# Altium PCB CellForge_PCB.PcbDoc (part 2 of 4)
Units mm, origin at the board's own origin, x right, y up, seen from the top; angles counter-clockwise.
Board outline 170.5 x 170.5 mm, 4 copper layers (Top Layer, Solid GND Plane, Power Distribution + signals, Bottom Layer), stack 1.586 mm thick; 199 components, 117 nets, 719 pads, 464 vias.
Unrouted connection lines stored in the file: 8.
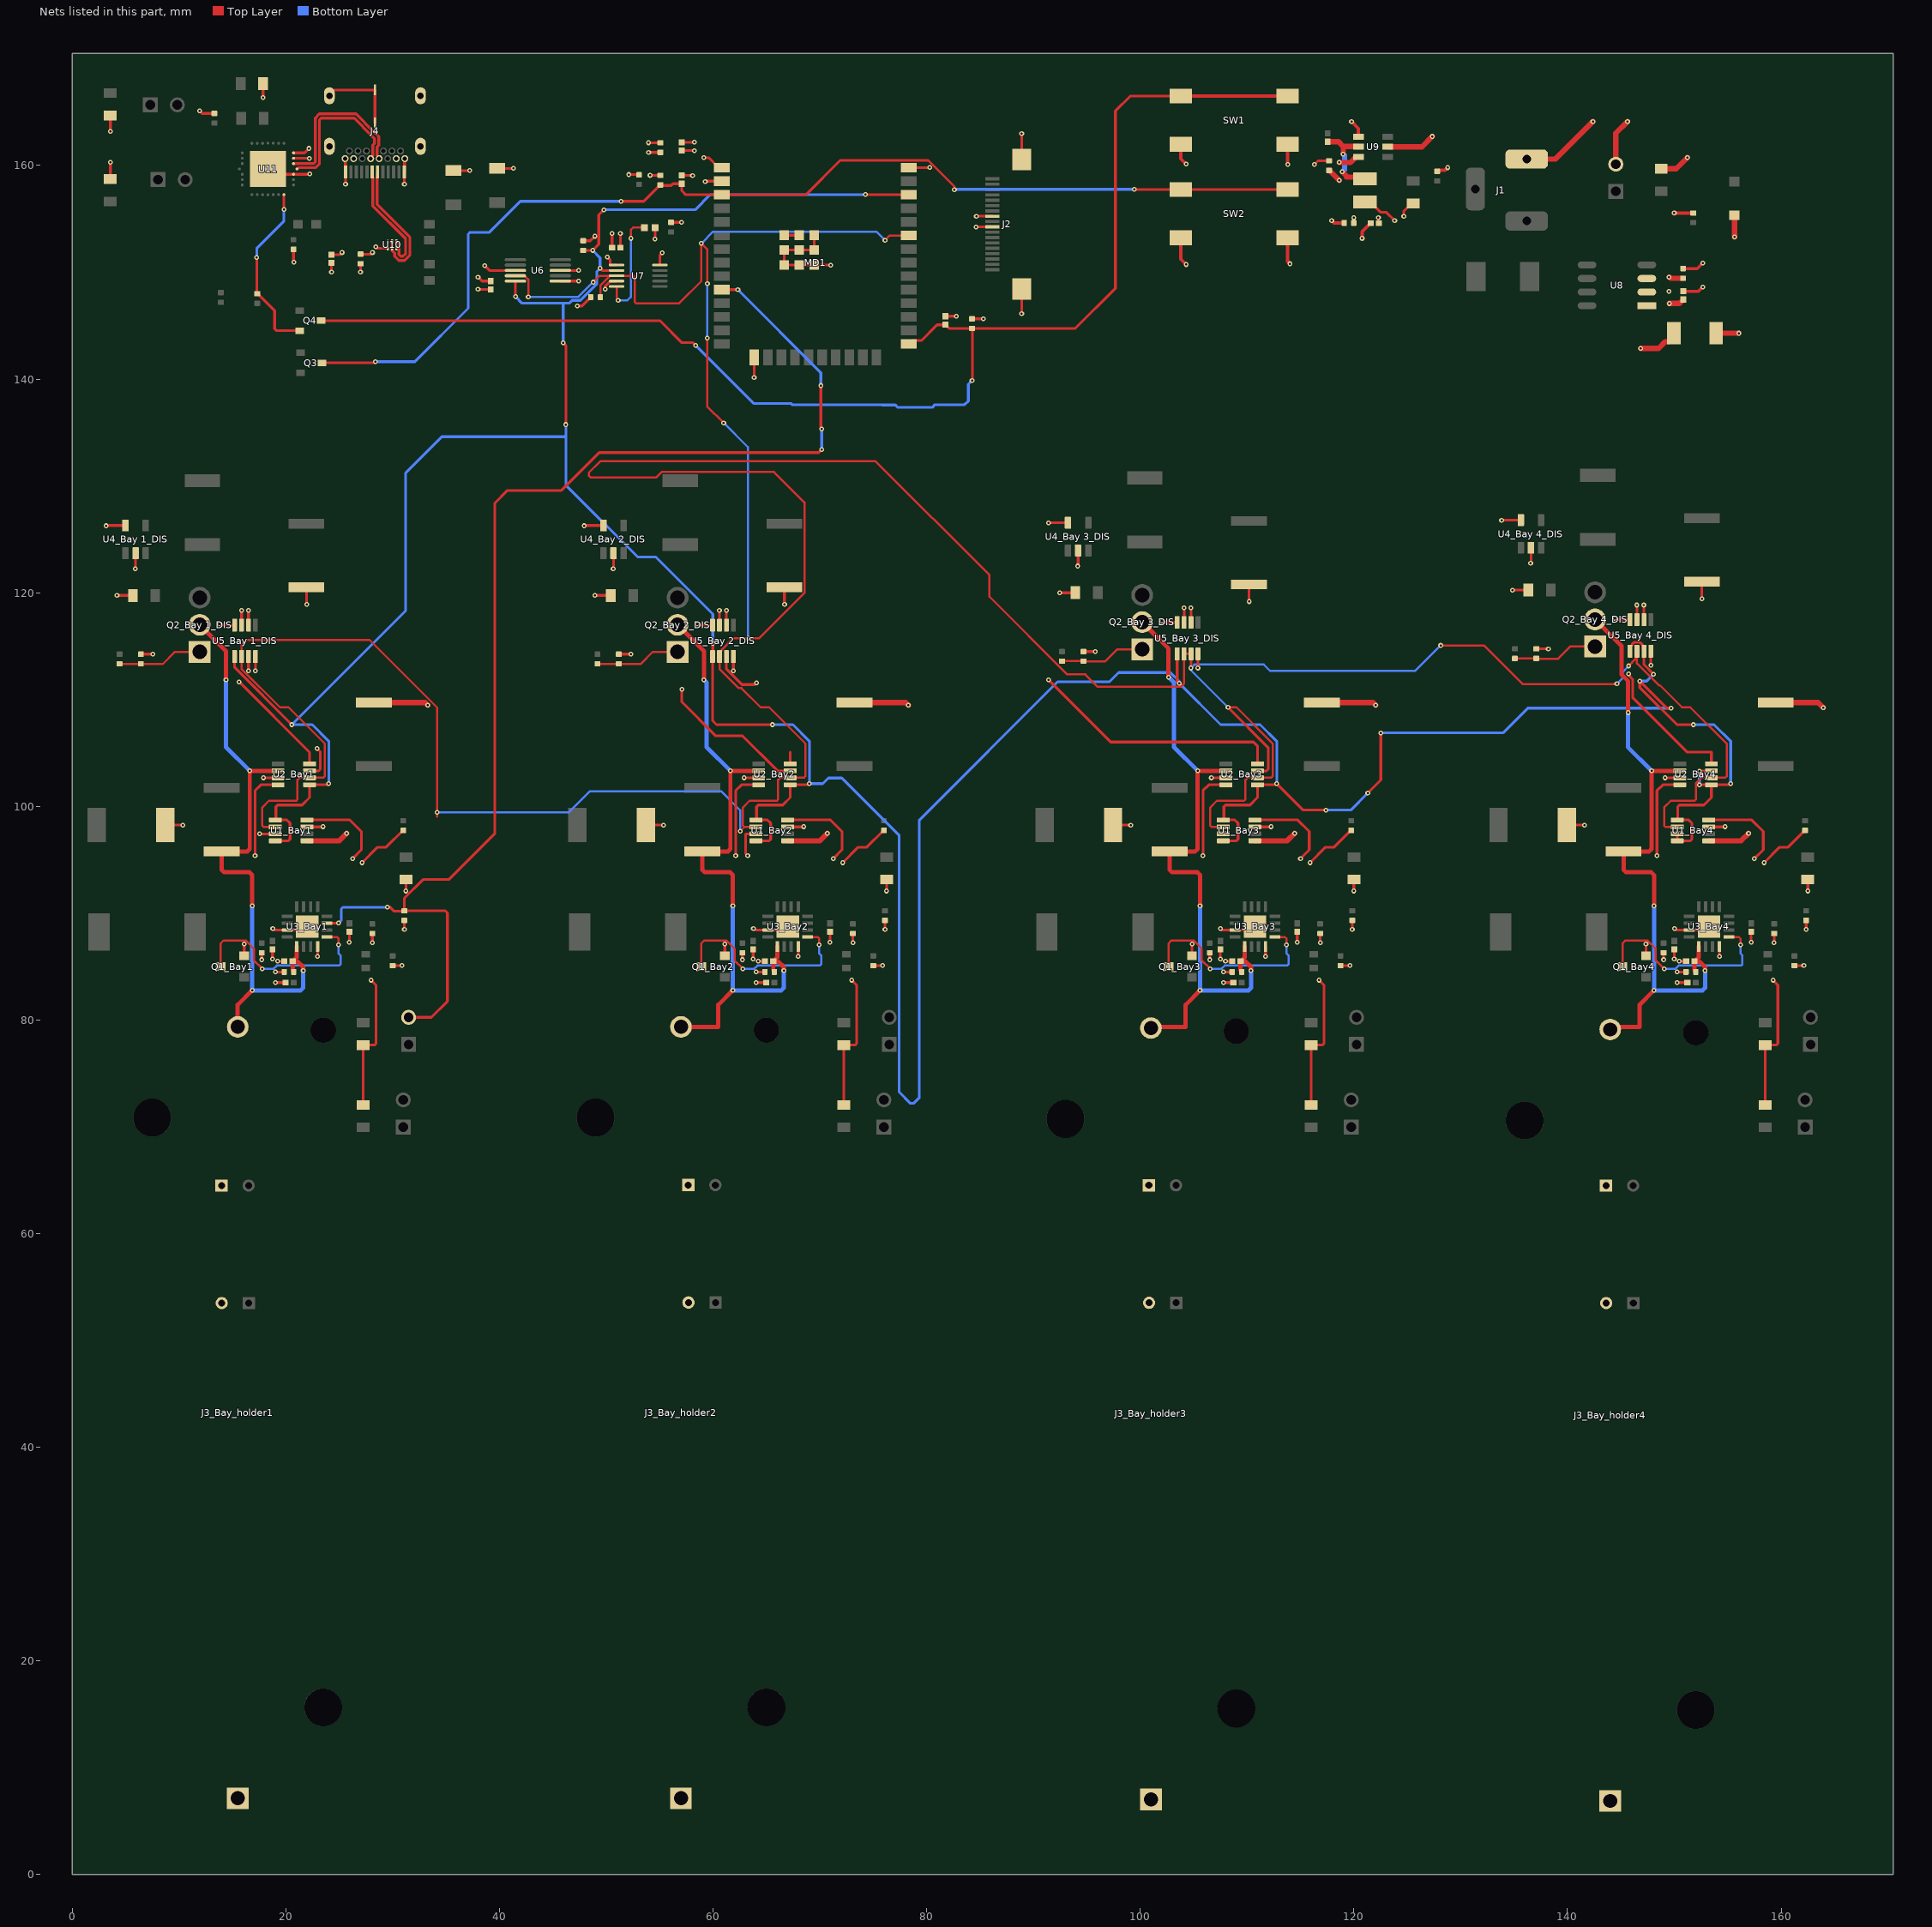
[diagram p4: the nets of this part, all layers, seen from the top]

## Part data
C1_Bay1 C1_Bay2 C1_Bay3 C1_Bay4 C4_Bay1 C4_Bay2 C4_Bay3 C4_Bay4 C5_Bay1 C5_Bay2 C5_Bay3 C5_Bay4 C9 C16 C17 C21: library part CMP-001-00074-3, "Chip Capacitor, 10µF +/-40%, 6.3V, 0402, Thickness 0.6 mm", Case/Package=0402, Max Operating Temperature=85°C, Min Operating Temperature=-55°C, Tolerance=10%, Voltage Rating=6.3V, Mounting Technology=SMT, Pins=2
C2_Bay1 C2_Bay2 C2_Bay3 C2_Bay4 C3_Bay1 C3_Bay2 C3_Bay3 C3_Bay4 C6_Bay1 C6_Bay2 C6_Bay3 C6_Bay4 C7_Bay1 C7_Bay2 C7_Bay3 C7_Bay4 C8 C10 C11 C12 C13 C14 C15 C18 C20: library part CMP-001-00001-6, "Chip Capacitor, 0.1 uF, +/- 5%, 16 V, 0402 (1005 Metric)", Capacitor Type=Ceramic, Case/Package=0402, Max Operating Temperature=125°C, Min Operating Temperature=-55°C, Tolerance=5%, Voltage Rating=16V, Mounting Technology=SM, Pins=2, RoHS Compliant=True
C19: library part CMP-001-00056-4, "Chip Capacitor, 2,2µF +/-20%, 10V, 0402, Thickness 0.6 mm", Case/Package=0402, Max Operating Temperature=85°C, Min Operating Temperature=-55°C, Tolerance=10%, Voltage Rating=10V, Mounting Technology=SMT, Pins=2
D1_Bay1 D1_Bay2 D1_Bay3 D1_Bay4: library part CMP-02539-000012-1, "DIODE SCHOTTKY 40V 3A DO214AB", Forward Current=3A, Manufacturer=Vishay, Max Junction Temp=+150°C, Max Repetitive Reverse Voltage=40V, Max Surge Forward Current=100A, Package=95402, Peak Reverse Current=0.5mA, Temperature="-55°C to +150°C", Temperature Range Low=-55°C, Automotive=No, Category=Diode, ComponentLink2Description=Datasheet, ComponentLink2URL=http://www.vishay.com/docs/88751/ss32.pdf, Device Class L1="Discrete Semiconductors", Device Class L2=Diodes, Device Class L3="Schottky Diodes", Digikey Description="DIODE SCHOTTKY 40V 3A DO214AB", Footprint Url=http://www.vishay.com/docs/95402/smc.pdf, Height=2.62mm, Lead Free=Yes, Manufacturer Part Number=SS34-E3/57T, Mouser Description="Schottky Diodes & Rectifiers 3.0 Amp 40 Volt", Octopart=https://octopart.com/ss34-e3%2F57t-vishay-39552907, RoHS=TRUE, Standoff Height=0mm, Temperature Range High=+150°C
D2: library part CMP-07401-000033-1, "TVS DIODE 15VWM 24.4VC SMB", Breakdown Voltage=19.2V, Case/Package=DO-214AA, Clamping Voltage=24.4V, Leakage Current=5uA, Max Operating Temperature=150°C, Max Power Dissipation=600W, Max Surge Current=100A, Min Breakdown Voltage=16.7V, Min Operating Temperature=-55°C, Operating Supply Voltage=3.5V, Package Quantity=1, Peak Pulse Current=24A, Power Line Protection=No, Resistor Type=Zener, Reverse Standoff Voltage=15V, Test Current=1mA, Diode Type=ZENER, Direction=Unidirectional, Element Configuration=Single, ESD Protection=Yes, Height=2.42mm, Length=4.57mm, Max Breakdown Voltage=19.2V, Max Reverse Leakage Current=5uA, Mount="Surface Mount", Number of Channels=1, Number of Elements=1, Number of Pins=2, Number of Unidirectional Channels=1, Packaging="Tape and Reel", Peak Pulse Power=600W, Polarity=Unidirectional, Radiation Hardening=No, REACH SVHC="No SVHC", Reverse Breakdown Voltage=16.7V, RoHS Compliant=Yes, Series=SMBJ, Termination=SMD/SMT, Width=3.94mm
D3: library part CMP-12792-000011-1, "DIODE ZENER 12V 500MW SOD123", Forward Current=10mA, Manufacturer="Diodes Inc", Max Junction Temp=+150°C, Max Reverse Leakage Current=0.1uA, Max Zener Voltage=12.7V, Nom Zener Voltage=12V, Package=SOD123, Power Dissipation=370mW, Reverse Voltage=8V, Temperature="-65°C to +150°C", Temperature Range Low=-65°C, Automotive=No, Automotive Grade=NA, Category=Diode, ComponentLink2Description=Datasheet, ComponentLink2URL=https://www.diodes.com/assets/Datasheets/ds18004.pdf, Device Class L1="Discrete Semiconductors", Device Class L2=Diodes, Device Class L3="Zener Diodes", Digikey Description="DIODE ZENER 12V 500MW SOD123", Footprint Url=https://www.diodes.com/assets/Package-Files/SOD123.pdf, Height=1.45mm, Lead Free=Yes, Manufacturer Part Number=BZT52C12-13-F, Mouser Description="Diode Zener Single 12V 5.39% 370mW Automotive 2-Pin SOD-123 T/R", Octopart=https://octopart.com/bzt52c12-13-f-diodes+inc.-326533, RoHS=TRUE, Standoff Height=0mm, Temperature Range High=+150°C, Zener Impedance=25Ω
DS1_Bay1 DS1_Bay2 DS1_Bay3 DS1_Bay4 DS3 DS5: library part CMP-007-00019-2, "LED Uni-Color Green, 100 mW, 30 mA, -55 to 100 degC, 2-Pin THD, RoHS, Bulk", Case/Package=Radial, Colour=Green, Forward Current=30mA, Forward Voltage=2.6V, Manufacturer=Lite-On, Max Operating Temperature=100°C, Min Operating Temperature=-55°C, Package Description="2-Pin Through Hole Device, Dia 3.8 mm", Package Quantity=1000, Power=100mW, Datasheet URL=http://datasheet.octopart.com/LTL-1CHG-Lite-On-datasheet-143841.pdf, Datasheet Version=Mar-00, Illumination Colour=Green, Lens Style=Dome, Luminous Intensity=12.6mcd, Manufacturer URL=http://www.us.liteon.com/, Mounting Technology=TH, Nominal Vf=2.1V, Package Reference=LTL-1CHG, Packaging=Bulk, Pins=2, RoHS Compliant=True, Viewing Angle=60degrees
DS2_Bay1 DS2_Bay2 DS2_Bay3 DS2_Bay4 DS6: library part CMP-007-00033-2, "The Super Bright Red Source Color Device, 1.85 V, -40 to 85 degC, 2-Pin THD, RoHS, Tape and Reel", Case/Package=Radial, Colour=Red, Forward Voltage=1.85V, Manufacturer=Kingbright, Package Description="2-Pin Through Hole Device, Dia 5.9 mm, Body Length 8.6 mm", Package Quantity=500, Package Reference=WP7113SRDD, Datasheet URL=http://www.kingbrightusa.com/images/catalog/SPEC/WP7113SRD-D.pdf, Datasheet Version="Rev. 6A, 07/2016", Illumination Colour=Red, Lens Style=Diffused, Luminous Intensity=300mcd, Mounting Technology=TH, Nominal Vf=1.85V, Packaging=Bulk, RoHS Compliant=True, Viewing Angle=30degrees
F1: library part CMP-005-00016-1, "Description", Manufacturer_Name="Littelfuse Inc", Component Type=Standard, Copyright="Copyright (C) 2025 Ultra Librarian. All rights reserved.", Design Item ID=0451004.MRL, Manufacturer_Part_Number=0451004.MRL, Pins=2, Source=0451004PMRL.SchLib
J1: library part CMP-1502-00188-3, "DC Power Jack Connector WR-DC, Male, Right Angled, THT, 5 A, 24 V", Color=Black, Current Rating=5A, Flammability Rating="UL94 V-0", Insulation Resistance=100MΩ, Max Operating Temperature=85°C, Min Operating Temperature=-40°C, Operating Supply Voltage=24V, Connector Type=Power, Contact Gender=Female, Contact Material="Gold, Tin", Contact Plating=Tin, Gender=Male, Height=11mm, Housing Material=Polyamide, Mount="Through Hole", Number of Contacts=3, Packaging=Bulk, REACH SVHC=Unknown, RoHS=Compliant, Shielding=Unshielded, Termination="Through Hole", Voltage Rating=24V
J2: library part CMP-1502-01630-3, "WR-FPC 0.50mm SMT Horiz. Bot. Contact Hinge type", Contact Resistance=50mΩ, Current Rating=500mA, Flammability Rating="UL94 V-0", Insulation Resistance=500MΩ, Max Operating Temperature=105°C, Min Operating Temperature=-40°C, Operating Supply Voltage=50V, Actuator Material="Nylon, Polyamide", Contact Material=Bronze, Contact Plating=Tin, Gender=Receptacle, Lead Pitch=500µm, Length=9.6mm, Mount="Surface Mount", Number of Contacts=18, Number of Pins=18, Number of Positions=18, Number of Rows=1, Orientation=Horizontal, Packaging="Tape and Reel", Pitch=500µm, REACH SVHC=Unknown, RoHS=Compliant, Termination=Solder, Voltage Rating=50V, Wire/Cable Type=Straight
J3_Bay_holder1 J3_Bay_holder2 J3_Bay_holder3 J3_Bay_holder4: library part CMP-19636-000034-1, "BATT HOLDER 18650 1 CELL PC PIN", Max Operating Temperature=145°C, Min Operating Temperature=-50°C, Package Quantity=50, Mount="Through Hole", Number of Cells=1, Packaging=Tray, Series=-, Termination="PC Pin"
J4: library part CMP-1502-03214-4, "Conn USB 3.1 Type C RCP 24 POS 0.5mm/0.4mm Solder RA SMD/Thru-Hole 24 Terminal 1 Port T/R", Contact Resistance=30mΩ, Current Rating=5A, Insulation Resistance=1GΩ, Max Operating Temperature=105°C, Min Operating Temperature=-40°C, Voltage Rating=20V, Connector Type=USB, Contact Material="Gold, Nickel", Gender=Receptacle, Height=3.21mm, Mount="Surface Mount, Through Hole", Number of Contacts=24, Number of Pins=24, Orientation=Horizontal, Packaging="Tape and Reel", Pin Length=1.9mm, RoHS=Compliant, Usb Standard="USB 3.1"
L1_Bay1 L1_Bay2 L1_Bay3 L1_Bay4: library part CMP-1396-00034-3, "Inductor Power Shielded Wirewound 22uH 20% 100KHz Ferrite 3A 0.05Ohm DCR Automotive T/R", Ambient Temperature Range High=110°C, Ambient Temperature Range Low=-40°C, Case/Package=Nonstandard, Current Rating=3A, DC Resistance (DCR)=42mΩ, Inductance=22µH, Inductance Tolerance=20%, Max Operating Temperature=150°C, Saturation Current=3.6A, Self Resonant Frequency=14.5MHz, Series Resistance=50mΩ, Test Frequency=100kHz, Composition=Wirewound, Core Material=Ferrite, Depth=10mm, Height=5mm, Height - Seated (Max)=5.0038mm, Length=10mm, Max DC Current=3A, Min Operating Temperature=-40°C, Mount="Surface Mount", Number of Pins=2, REACH SVHC=Unknown, RMS Current (Irms)=3A, RoHS=Compliant, Shielding=Shielded, Termination=SMD/SMT, Tolerance=20%, Width=10mm
L2: library part CMP-006-00009-6, "Chip Inductor, 2.2 uH, +/- 20%, -55 to 125 degC, 1008 (2520 Metric), RoHS, Tape and Reel", Case/Package=1008, Current Rating=1.3A, Manufacturer=Murata, Max Operating Temperature=125°C, Min Operating Temperature=-55°C, Package Description="2-Pin Surface Mounted Device, Body 2.5 x 2 mm", Package Quantity=3000, Self Resonant Frequency=40MHz, Tolerance=20%, Core Material=Ferrite, Datasheet URL=http://psearch.en.murata.com/inductor/product/LQM2HPN2R2MG0%23.pdf, Datasheet Version=Aug-16, Mounting Technology=SM, Package Reference=1008, Packaging=TapeandReel, RoHS Compliant=True, Shielding=Shielded
MD1: library part CMP-194065-000026-1, "RX TXRX MOD WIFI TRACE ANT SMD"
Q1_Bay1 Q1_Bay2 Q1_Bay3 Q1_Bay4: library part CMP-32901-000180-1, "MOSFET N-CH 60V 0.3A SOT23", Case/Package=SOT-23, Continuous Drain Current (ID)=300mA, Drain to Source Voltage (Vdss)=60V, Gate to Source Voltage (Vgs)=20V, Input Capacitance=20pF, Max Operating Temperature=150°C, Max Power Dissipation=500mW, Min Operating Temperature=-55°C, Halogen Free="Halogen Free", Lead Free="Lead Free", Max Dual Supply Voltage=60V, Mount="Surface Mount", Number of Pins=3, Packaging="Tape and Reel", Rds On Max=3R, Rise Time=3.3ns
"Q2_Bay 1_DIS" "Q2_Bay 2_DIS" "Q2_Bay 3_DIS" "Q2_Bay 4_DIS": "Disc Mosfet N-CH Linear L2 TO-220AB/FP", Manufacturer_Name=LITTELFUSE, Mouser Part Number=747-IXTP80N075L2, Datasheet Link=https://www.littelfuse.com/~/media/electronics/datasheets/discrete_mosfets/littelfuse_discrete_mosfets_n-channel_linear_ixt_80n075_datasheet.pdf.pdf, Geometry.Height=4.83mm, Manufacturer_Part_Number=IXTP80N075L2, Mouser Price/Stock=https://www.mouser.co.uk/ProductDetail/IXYS/IXTP80N075L2?qs=gQEZvVdd8Gt%252BIzAwxn7K4A%3D%3D
Q3 Q4: library part CMP-20235-000001-1, "NPN TRANSISTOR 1.5A 40V SOT-23 R", Case/Package=TO-236-3, Collector Emitter Breakdown Voltage=25V, Collector Emitter Voltage (VCEO)=400mV, Max Collector Current=1.5A, Max Power Dissipation=300mW, Transition Frequency=100MHz, Max Breakdown Voltage=25V, Mount="Surface Mount", Packaging="Tape and Reel", RoHS Compliant=Yes
R1_Bay1 R1_Bay2 R1_Bay3 R1_Bay4 R2_Bay1 R2_Bay2 R2_Bay3 R2_Bay4 R6_Bay1 R6_Bay2 R6_Bay3 R6_Bay4 R10 R11 R12 R18 R19 R20 R25 R28 R29 R34: library part CMP-009-00066-2, "10K 0.063W 1% 0402 (1005 Metric)  SMD", Case/Package=0402, Power=63mW, Tolerance=1%, Mounting Technology=SMT, Pins=2
R3_Bay1 R3_Bay2 R3_Bay3 R3_Bay4 R22: library part CMP-03412-037835-1, "RC0805JR-07100KL, RES SMD 100K OHM 5% 1/8W 0805", Case Code (Imperial)=0805, Case Code (Metric)=2012, Max Operating Temperature=155°C, Max Power Dissipation=125mW, Min Operating Temperature=-55°C, Resistance=100kR, Resistance Tolerance=5%, Resistor Type="Thick Film", Temperature Coefficient=100ppm/°C, Voltage Rating=150V, Case/Package=0805, Construction=Rectangular, Contact Plating=Tin, Depth=1.25mm, Features="Moisture Resistant", Lead Free="Lead Free", Length=2mm, Military Standard=Not, Number of Terminations=2, Packaging="Tape and Reel", Power Rating=125mW, Radiation Hardening=No, RoHS Compliant=Yes, Series=RC, Size Code=0805, Termination=SMD/SMT, Tolerance=5%
R4_Bay1 R4_Bay2 R4_Bay3 R4_Bay4 R5_Bay1 R5_Bay2 R5_Bay3 R5_Bay4 "R13_Bay 1_DIS" "R13_Bay 2_DIS" "R13_Bay 3_DIS" "R13_Bay 4_DIS" R23 R30 R31 R37 R38: library part CMP-03412-037820-1, "RC0805JR-071KL, RES SMD 1K OHM 5% 1/8W 0805", Case Code (Imperial)=0805, Case Code (Metric)=2012, Max Operating Temperature=155°C, Max Power Dissipation=125mW, Min Operating Temperature=-55°C, Resistance=1kR, Resistance Tolerance=5%, Resistor Type="Thick Film", Temperature Coefficient=100ppm/°C, Voltage Rating=150V, Case/Package=0805, Construction=Rectangular, Contact Plating=Tin, Depth=1.25mm, Features="Moisture Resistant", Lead Free="Lead Free", Length=2mm, Military Standard=Not, Number of Terminations=2, Packaging="Tape and Reel", Power Rating=125mW, Radiation Hardening=No, RoHS Compliant=Yes, Series=RC, Size Code=0805, Termination=SMD/SMT, Tolerance=5%
R7_Bay1 R7_Bay2 R7_Bay3 R7_Bay4 R9_Bay1 R9_Bay2 R9_Bay3 R9_Bay4: library part CMP-2000-05824-2, "103AT-2, Thermistor NTC 10KOhm 1% 2-Pin", Max Operating Temperature=110°C, Min Operating Temperature=-50°C, Resistance=10kR, Tolerance=1%, Height=2.4mm, Lead Pitch=2.54mm, Length=17mm, Number of Pins=2, Packaging=Bulk, RoHS Compliant=Yes, Series=AT, Termination=Radial, Width=3.7mm
R8_Bay1 R8_Bay2 R8_Bay3 R8_Bay4: library part CMP-2000-04064-1, "RC0603FR-074K53L", Manufacturer=Yageo, Part Number=RC0603FR-074K53L
"R14_Bay 1_DIS" "R14_Bay 2_DIS" "R14_Bay 3_DIS" "R14_Bay 4_DIS" R36: library part CMP-009-00137-3, "Chip Resistor, 47,5 kOhms, +/-1 %, 63 mW, -55 to 155 degC, 0402", Case/Package=0402, Max Operating Temperature=155°C, Min Operating Temperature=-55°C, Power=63mW, Tolerance=1%, Pins=2
"R15_Bay 1_DIS" "R15_Bay 2_DIS" "R15_Bay 3_DIS" "R15_Bay 4_DIS": library part CMP-009-00178-1, "Description CRM2512-FX-R200ELF", Manufacturer_Name="Bourns Electronics", Manufacturer_Part_Number=CRM2512-FX-R200ELF, Component Type=Standard, Copyright="Copyright (C) 2026 Ultra Librarian. All rights reserved.", Design Item ID=CRM2512-FX-R200ELF, Pins=2, Source=CRM2512-FX-R200ELF.SchLib
"R16_Bay 1_DIS" "R16_Bay 2_DIS" "R16_Bay 3_DIS" "R16_Bay 4_DIS": library part CMP-009-00167-3, "Chip Resistor, 100 Ohms, +/-1 %, 63 mW, -55 to 155 degC, 0402", Case/Package=0402, Max Operating Temperature=155°C, Min Operating Temperature=-55°C, Power=63mW, Tolerance=1%, Pins=2
"R17_Bay 1_DIS" "R17_Bay 2_DIS" "R17_Bay 3_DIS" "R17_Bay 4_DIS" R_SHUNT1_Bay1 R_SHUNT1_Bay2 R_SHUNT1_Bay3 R_SHUNT1_Bay4 RS1_Bay1 RS1_Bay2 RS1_Bay3 RS1_Bay4: library part CMP-009-00177-1, "RL2512FK-070R068L", Manufacturer_Name=Yageo, Component Type=Standard, Copyright="Copyright (C) 2026 Ultra Librarian. All rights reserved.", Design Item ID=RL2512FK-070R068L, Manufacturer_Part_Number=RL2512FK-070R068L, Pins=2, Source=RL2512FK-070R068L.SchLib
R21: library part CMP-009-00021-5, "Chip Resistor, 100 KOhm, +/- 1%, 0.063 W, -55 to 155 degC, 0402 (1005 Metric)", Case/Package=0402, Max Operating Temperature=155°C, Min Operating Temperature=-55°C, Power=63mW, Tolerance=1%, Voltage Rating=50V, Mounting Technology=SM, Pins=2, RoHS Compliant=True
R24: library part CMP-009-00123-3, "Chip Resistor, 22 kOhms, +/-1 %, 63 mW, -55 to 155 degC, 0402", Case/Package=0402, Max Operating Temperature=155°C, Min Operating Temperature=-55°C, Power=63mW, Tolerance=1%, Pins=2
R26 R27: library part CMP-2100-03667-1, "Chip Resistor, 0 Ohm, +/- 5%, 0.1 W, -55 to 155 degC, 0603 (1608 Metric), RoHS, Tape and Reel RC0603JR-070RL", Case Code (Imperial)=0603, Case Code (Metric)=1608, Manufacturer=Yageo, Max Operating Temperature=155degC, Min Operating Temperature=-55degC, Package Description="2-Pin Surface Mount Device, Body 1.6 x 0.8 mm", Package Quantity=5000, Power Rating=100mW, Resistance=0mOhm, Temperature Coefficient=200ppm/degreesC, Tolerance=5%, Voltage Rating=50V, Case/Package=0603, Composition=ThickFilm, Contact Plating=Tin, Datasheet URL=http://www.yageo.com/NewPortal/yageodocoutput?fileName=/pdf/R-Chip/PYu-RC_Group_51_RoHS_L_5.pdf, Datasheet Version="Rev. 5, 10/2016", Depth=0.8mm, Height=0.45mm, Lead Free=LeadFree, Length=1.6mm, Manufacturer URL=http://www.yageo.com/, Military Standard=Not, Number of Pins=2, Package Reference=0603, Packaging=TapeandReel, Radiation Hardening=No, REACH SVHC=NoSVHC, RoHSCompliant=true, Termination=SMD/SMT, Voltage Rating (DC)=50V, Width=0.8mm
R32 R33: library part CMP-03412-000130-1, "RES SMD 5.1K OHM 0.1% 1/4W 1206 RT1206BRE075K1L", Manufacturer=Yageo, Manufacturer Part Number=RT1206BRE075K1L, Package=RT1206, Power Rating=0.25W, Resistance=5.1KΩ, Temperature="-55°C to +155°C", Temperature Coefficient="50 ppm/°C", Temperature Range High=+155°C, Temperature Range Low=-55°C, Tolerance=0.005, Voltage Rating=200V, Automotive=No, Category=Res, ComponentLink2Description=Datasheet, ComponentLink2URL=http://www.yageo.com/documents/recent/PYu-RT_1-to-0.01_RoHS_L_9.pdf, Composition="Thin Film", Device Class L1="Passive Components", Device Class L2=Resistors, Device Class L3="Chip SMD Resistors", Digikey Description="RES SMD 5.1K OHM 0.1% 1/4W 1206", Footprint Url=http://www.yageo.com/exep/pages/download/literatures/PYu-R_Mount_10.pdf, Height=0.65mm, Ipc Land Pattern Name=RESC310160X55, Lead Free=Yes, Octopart=https://octopart.com/rt1206bre075k1l-yageo-1210412, RoHS=TRUE, Series=RT
R35: library part CMP-03412-003430-1, "RES SMD 22.1K OHM 1% 1/10W 0603 RT0603FRD0722K1L", Manufacturer=Yageo, Manufacturer Part Number=RT0603FRD0722K1L, Package=RT0603, Power Rating=0.1W, Resistance=22.1KΩ, Temperature="-55°C to +155°C", Temperature Coefficient="25 ppm/°C", Temperature Range High=+155°C, Temperature Range Low=-55°C, Tolerance=0.01, Voltage Rating=75V, Automotive=No, Category=Res, ComponentLink2Description=Datasheet, ComponentLink2URL=http://www.yageo.com/documents/recent/PYu-RT_1-to-0.01_RoHS_L_9.pdf, Composition="Thin Film", Device Class L1="Passive Components", Device Class L2=Resistors, Device Class L3="Chip SMD Resistors", Digikey Description="RES SMD 22.1K OHM 1% 1/10W 0603", Footprint Url=http://www.yageo.com/exep/pages/download/literatures/PYu-R_Mount_10.pdf, Height=0.55mm, Ipc Land Pattern Name=RESC16080X45, Lead Free=Yes, Octopart=https://octopart.com/rt0603frd0722k1l-yageo-71395326, RoHS=TRUE, Series=RT
SW1 SW2: library part CMP-26321-000001-1, "SWITCH TACTILE SPST-NO 0.05A 12V", Contact Current Rating=50mA, Contact Resistance=100mΩ, Manufacturer=Schurter, Operating Force=1.6N, Package=0, Temperature="-20°C to +70°C", Temperature Range High=+70°C, Temperature Range Low=-20°C, Voltage Rating Dc=12V, Automotive=No, Category=Switch, ComponentLink2Description=Datasheet, ComponentLink2URL=https://www.schurter.com/en/datasheet/typ_6x6_mm_tact_switches.pdf, Device Class L1=Electromechanical, Device Class L2=Switches, Device Class L3="Tactile Switches", Digikey Description="SWITCH TACTILE SPST-NO 0.05A 12V", Electromechanical Life=100000Cycles, Height=12.5mm, Lead Free=Yes, Manufacturer Part Number=1301.9320, Mount="Surface Mount", Octopart=https://octopart.com/1301.9320-schurter-6627962, RoHS=TRUE, Throw Configuration=SPST-NO
U1_Bay1 U1_Bay2 U1_Bay3 U1_Bay4 U2_Bay1 U2_Bay2 U2_Bay3 U2_Bay4 "U5_Bay 1_DIS" "U5_Bay 2_DIS" "U5_Bay 3_DIS" "U5_Bay 4_DIS": library part CMP-0704-00043-2, "Zero-Drift, Bi-Directional Current / Power Monitor, 3 to 5.5 V, -40 to 125 degC, 8-pin SOP (DCN8), Green (RoHS & no Sb/Br)", Manufacturer="Texas Instruments", Quiescent Current (+/-)(Typ)(mA)=0.7, Rating=Catalog, CMRR(Min)(dB)=100, Code_JEDEC=MO-178, Common Mode Range(Max)(V)=26, Common Mode Range(Min)(V)=0, ComponentLink1Description="Manufacturer URL", ComponentLink1URL=http://www.ti.com/, ComponentLink2Description=Datasheet, ComponentLink2URL=http://www.ti.com/general/docs/lit/getliterature.tsp?genericPartNumber=INA219&fileType=pdf, ComponentLink3Description="Package Specification", ComponentLink3URL=http://www.ti.com/lit/ml/mpds099c/mpds099c.pdf, DatasheetVersion=SBOS448F, Eco-Plan="Green (RoHS & no Sb/Br)", Gain(V/V)="1, 0.5, 0.25, 0.125", Input Offset (+/-)(Max)(uV)=50, Mounting Technology="Surface Mount", PackageDescription="8-Pin Plastic Small Outline, Body 1.6 x 2.9 mm, Pitch 0.65 mm", PackageReference=DCN0008A, PackageVersion="4202106/D, 11/2009", PartNumber=INA219BIDCNR, Small-Signal Bandwidth(Typ)(MHz)=0.011, SubFamily="Current Shunt Monitor", Vs(Max)(V)=5.5, Vs(Min)(V)=3
U3_Bay1 U3_Bay2 U3_Bay3 U3_Bay4: "2A-switch buck 8.4V / 4.2V rechargeable lithium battery", Package=Package, Availability="Not in stock", Check_prices=https://www.snapeda.com/parts/TP5100/NanJing+Top+Power+ASIC+Corp./view-part/?ref=eda, MF="NanJing Top Power ASIC Corp.", MP=TP5100, Price=None, SnapEDA_Link=https://www.snapeda.com/parts/TP5100/NanJing+Top+Power+ASIC+Corp./view-part/?ref=snap
"U4_Bay 1_DIS" "U4_Bay 2_DIS" "U4_Bay 3_DIS" "U4_Bay 4_DIS": library part CMP-0272-00862-4, "IC OPAMP ZER-DRIFT 1CIRC SOT23-5", Case/Package=SOT-23-5, Input Bias Current=200pA, Input Offset Voltage (Vos)=10uV, Max Dual Supply Voltage=2.75V, Max Operating Temperature=125°C, Max Supply Voltage=5.5V, Min Dual Supply Voltage=900mV, Min Operating Temperature=-40°C, Min Supply Voltage=1.8V, Nominal Supply Current=25uA, Operating Supply Current=17uA, Output Current=5mA, Package Quantity=1, Power Supply Rejection Ratio (PSRR)=120dB, Voltage Gain=130dB, Bandwidth=350kHz, Common Mode Rejection Ratio=106dB, Contact Plating=Gold, Gain Bandwidth Product=350kHz, Lead Free="Lead Free", Max I/O Voltage=10uV, Number of Amplifiers=1, Number of Channels=1, Number of Circuits=1, Number of Elements=1, Number of Pins=5, Operating Supply Voltage=2.75V, Output Current per Channel=5mA, Packaging="Tape and Reel", Radiation Hardening=No, REACH SVHC="No SVHC", Slew Rate=0.16V/µs, Unity Gain Bandwidth Product=350kHz
U6: library part CMP-0003-00378-2, "16-Bit ADC with Integrated Multiplexer, PGA, Comparator, Oscillator, and Reference, -40 to 125 degC, 10-pin SOP (DGS10), Green (RoHS & no Sb/Br)", Analog Voltage AV/DD(Max)(V)=5.5, Analog Voltage AV/DD(Min)(V)=2, Manufacturer="Texas Instruments", # Input Channels=4, Architecture=Delta-Sigma, Code_JEDEC=MO-153, ComponentLink1Description="Manufacturer URL", ComponentLink1URL=http://www.ti.com/, ComponentLink2Description=Datasheet, ComponentLink2URL=http://www.ti.com/general/docs/lit/getliterature.tsp?genericPartNumber=ADS1115&fileType=pdf, ComponentLink3Description="Package Specification", ComponentLink3URL=http://www.ti.com/lit/ml/mpds035b/mpds035b.pdf, DatasheetVersion=SBAS444B, Digital Supply(Max)(V)=5.5, Digital Supply(Min)(V)=2, Eco-Plan="Green (RoHS & no Sb/Br)", INL(Max)(+/-LSB)=1, Interface="Serial I2C", Mounting Technology="Surface Mount", PackageDescription="10-Pin Plastic Small Outline, Body 3 x 3 mm, Pitch 0.5 mm", PackageReference=DGS10, PackageVersion="4073272/C, 02/2004", PartNumber=ADS1115IDGST, Resolution(Bits)=16, Sample Rate (max)(SPS)=860, SubFamily="Precision ADC (<=10MSPS)"
U7: library part CMP-0188-01009-2, "12-Bit Quad Digital-to-Analog Converter with EEPROM Memory, 10-pin MSOP, Extended Temperature, Tape and Reel", ComponentLink1Description="Manufacturer URL", ComponentLink1URL=http://www.microchip.com/, ComponentLink2Description=Datasheet, ComponentLink2URL=http://ww1.microchip.com/downloads/en/DeviceDoc/22187E.pdf, ComponentLink3Description="Package Specification", ComponentLink3URL=http://www.microchip.com/stellent/groups/techpub_sg/documents/packagingspec/en012702.pdf, DatasheetVersion="revE, Oct-2010", PackageDescription="10-Lead Plastic Micro Small Outline Package (UN) [MSOP]", PackageReference=MSOP-UN10, PackageVersion="revBB, Aug-2009", RevisionNote="URLs added. DatasheetVersion updated."
U8: library part CMP-010-000000-1, "FDS4435BZ", Manufacturer_Name=onsemi, Component Type=Standard, Copyright="Copyright (C) 2025 Ultra Librarian. All rights reserved.", Design Item ID=FDS4435BZ, Manufacturer_Part_Number=FDS4435BZ, Pin Count=8, RefDes=RefDes, Source=FDS4435BZ.SchLib, Type=Type
U9: library part CMP-006-000000-1, "LMR51430YDDCR; SIMPLE SWITCHER&reg; 4.5-V to 36-V, 3-A synchronous buck converter with 40-&micro;A IQ 6-SOT-23-THIN -40 to 150", Manufacturer_Name="Texas Instruments", Manufacturer_Part_Number=LMR51430YDDCR, Component Type=Standard, Copyright="Copyright (C) 2025 Ultra Librarian. All rights reserved.", Design Item ID=LMR51430YDDCR, Pin Count=6, RefDes=RefDes, Source=LMR51430YDDCR.SchLib, Type=Type
U10: library part CMP-004-00025-1, "Ultra Low Capacitance ESD Protection Array for High Speed Data Line Protection, 6-Pin UDFN, Pb-Free, Tape and Reel", ComponentLink1Description="Manufacturer URL", ComponentLink1URL=http://www.onsemi.com/, ComponentLink2Description=Datasheet, ComponentLink2URL=http://www.onsemi.cn/pub_link/Collateral/ESDR0502N-D.PDF, ComponentLink3Description="Package Specification", ComponentLink3URL=http://www.onsemi.com/pub_link/Collateral/517AA.PDF, Mounting Technology=SMT, Pins=6
U11: library part CMP-08093-000004-1, "IC BRIDGE USB TO UART 28QFN", Ambient Temperature Range High=+85°C, Ambient Temperature Range Low=-40°C, Manufacturer="Silicon Labs", Max Junction Temp=+105°C, Max Supply Voltage=5.25V, Min Supply Voltage=1.71V, Nominal Supply Current=195-13700uA, Temperature="-40°C to +85°C", Automotive=No, Category=IC, ComponentLink2Description=Datasheet, ComponentLink2URL=https://media.digikey.com/pdf/Data%20Sheets/Silicon%20Laboratories%20PDFs/CP2102N_Rev.1.3_DS.pdf, Device Class L1="Integrated Circuits (ICs)", Device Class L2="Interface ICs", Device Class L3="USB Interface ICs", Digikey Description="IC BRIDGE USB TO UART 28QFN", Height=0.8mm, Interface=UART,USB,RS-232,RS-485, Ipc Land Pattern Name=QFN50P500X500X75-28, Lead Free=Yes, Manufacturer Part Number=CP2102N-A01-GQFN28, Mouser Description="IC BRIDGE USB TO UART 28QFN", Number of Ports=1, Octopart=https://octopart.com/cp2102n-a01-gqfn28-silicon+labs-74636024, Package=CP2102N-A01-GQFN28, RoHS=TRUE, Standoff Height=0mm, Temperature Range High=+85°C, Temperature Range Low=-40°C, Usb Standard="USB 2.0"

## Via types
v1: diameter 0.45, hole 0.2, Top Layer to Bottom Layer, tented both sides, 464 vias

## Nets (pads, with @x,y where several pads share a name; then routed paths per layer and width w, separated by ;. In a path a pad name is that pad's centre, name@x,y a point inside that pad or via, vN(x,y) a via of type N, cw(c..) or ccw(c..) an arc to the next point about the centre after c; other vN are vias at no path point)
3V3: "U4_Bay 1_DIS.5" "U4_Bay 2_DIS.5" "U4_Bay 3_DIS.5" "U4_Bay 4_DIS.5" "U5_Bay 1_DIS.4" "U5_Bay 2_DIS.4" "U5_Bay 2_DIS.7" "U5_Bay 3_DIS.4" "U5_Bay 4_DIS.4" C8.1 C9.1 C12.1 C13.1 C15.1 C16.1 C20.1 C21.1 J2.11 L2.2 MD1.2 R1_Bay1.1 R1_Bay2.1 R1_Bay3.1 R1_Bay4.1 R2_Bay1.1 R2_Bay2.1 R2_Bay3.1 R2_Bay4.1 R4_Bay1.1 R4_Bay2.1 R4_Bay3.1 R4_Bay4.1 R5_Bay1.1 R5_Bay2.1 R5_Bay3.1 R5_Bay4.1 R6_Bay1.1 R6_Bay2.1 R6_Bay3.1 R6_Bay4.1 R10.1 R11.1 R12.1 R18.1 R19.1 R20.1 R21.1 R22.1 R30.1 R31.1 R38.2 U1_Bay1.4 U1_Bay2.4 U1_Bay2.7 U1_Bay3.4 U1_Bay4.4 U2_Bay1.4 U2_Bay1.8 U2_Bay2.4 U2_Bay2.7 U2_Bay2.8 U2_Bay3.4 U2_Bay3.8 U2_Bay4.4 U2_Bay4.8 U6.8 U7.1 U11.6 U11.7 | length 266.4
  Top Layer w0.254: v1(3.175,126.275) 3.2,126.3 4.981,126.3 ; R31.1@3.575,158.725 v1(3.575,160.3) ; v1(3.575,163.175) R30.1@3.575,164.675 ; v1(13.775,117.075) 13.875,116.975 15.206,116.975 ; v1(15.625,111.65) 15.65,111.65 22.225,105.075 U2_Bay1.8@22.225,103.975 ; v1(17.125,95.4) 17.125,101.475 17.675,102.025 U2_Bay1.4@19.275,102.025 ; v1(17.875,166.35) R38.2@17.875,167.675 ; U11.6@20.725,160.675 v1(22.2,160.675) ; U11.7@20.725,161.175 21.75,161.175 v1(22.175,161.6) ; U1_Bay1.4@21.975,98.725 26,98.725 27.075,97.65 27.075,95.925 v1(26.25,95.1) ; C20.1@24.275,151.655 25.08,151.655 v1(25.275,151.85) ; C21.1@27,151.7 27.975,151.7 v1(28.125,151.85) ; v1(27.15,94.725) 28.601,96.176 29.401,96.176 30.975,97.75 R6_Bay1.1@31,97.75 ; R4_Bay1.1@27.25,72.05 R5_Bay1.1@27.25,77.65 28.301,77.65 28.45,77.799 28.45,83.275 v1(28,83.725) ; R2_Bay1.1@30,85.1 v1(30.875,85.1) ; v1(31.1,88.475) R1_Bay1.1@31.1,89.325 ; v1(38,149.55) 38.375,149.175 C12.1@39.175,149.175 ; v1(38.625,150.625) 39.075,150.175 U6.8@41.5,150.175 ; v1(47.3,146.85) 47.75,146.85 48.55,147.65 R19.1@48.55,147.675 ; R18.1@47.85,152.95 48.506,152.95 48.931,153.375 v1(48.95,153.375) ; v1(47.925,126.275) 47.95,126.3 49.731,126.3 ; v1(50.1,151.425) 50.377,151.148 50.377,150.677 50.379,150.675 U7.1@50.975,150.675 ; C13.1@51.325,152.3 v1(51.325,153.65) ; v1(52.125,159.15) 53.05,159.15 R12.1@53.075,159.125 ; v1(53.975,161.225) C9.1@55.075,161.225 ; v1(54.1,159.075) R10.1@55.075,159.075 ; v1(54.575,153.1) R21.1@54.575,154.175 ; R20.1@56.075,154.675 v1(57.05,154.675) ; v1(57.075,110.975) 57.075,109.775 60.25,106.6 62.767,106.6 66.042,103.325 U2_Bay2.7@67.225,103.325 ; C8.1@57.075,161.395 58.23,161.395 v1(58.25,161.375) ; v1(58.525,117.075) 58.625,116.975 59.956,116.975 ; v1(59.275,158.5) 59.305,158.53 MD1.2@60.825,158.53 ; 61.256,114.025 61.256,112.843 62.694,111.405 63.905,111.405 v1(64.075,111.575) ; v1(62.125,95.4) 62.125,101.475 62.675,102.025 U2_Bay2.4@64.275,102.025 ; v1(63.25,95.375) 63.049,95.576 63.049,97.425 U1_Bay2.7@64.025,97.425 ; U1_Bay2.4@66.975,98.725 71,98.725 72.075,97.65 72.075,95.925 v1(71.25,95.1) ; U2_Bay2.8@67.225,103.975 67.225,105.075 ; v1(72.15,94.725) 73.601,96.176 74.401,96.176 75.975,97.75 R6_Bay2.1@76,97.75 ; R4_Bay2.1@72.25,72.05 R5_Bay2.1@72.25,77.65 73.301,77.65 73.45,77.799 73.45,83.275 v1(73,83.725) ; R2_Bay2.1@75,85.1 v1(75.875,85.1) ; v1(76.1,88.475) R1_Bay2.1@76.1,89.325 ; R11.1@84.25,145.65 v1(85.3,145.65) ; v1(84.65,155.25) J2.11@86.15,155.25 ; v1(91.4,111.85) 97.225,106.025 110.613,106.025 110.975,105.663 U2_Bay3.8@110.975,103.975 ; v1(91.425,126.525) 91.45,126.55 93.231,126.55 ; v1(102.025,117.325) 102.125,117.225 103.456,117.225 ; v1(105.875,95.4) 105.875,101.475 106.425,102.025 U2_Bay3.4@108.025,102.025 ; U1_Bay3.4@110.725,98.725 114.75,98.725 115.825,97.65 115.825,95.925 v1(115,95.1) ; v1(115.9,94.725) 117.351,96.176 118.151,96.176 119.725,97.75 R6_Bay3.1@119.75,97.75 ; R4_Bay3.1@116,72.05 R5_Bay3.1@116,77.65 117.051,77.65 117.2,77.799 117.2,83.275 v1(116.75,83.725) ; R2_Bay3.1@118.75,85.1 v1(119.625,85.1) ; v1(119.85,88.475) R1_Bay3.1@119.85,89.325 ; C16.1@120,154.625 v1(120,155.1) ; L2.2@121.05,156.58 121.545,156.58 122.492,155.633 123.017,155.633 v1(123.825,154.825) ; v1(122.3,155.125) 122.3,154.65 C15.1@122.35,154.6 ; v1(124.675,155.25) 124.675,155.725 125.4,156.45 R22.1@125.55,156.45 ; v1(133.825,126.775) 133.85,126.8 135.631,126.8 ; v1(144.425,117.575) 144.525,117.475 145.856,117.475 ; v1(145.725,112.4) 145.725,112.279 146.102,111.902 146.102,110.198 151.225,105.075 153.475,105.075 U2_Bay4.8@153.475,103.975 ; v1(148.375,95.4) 148.375,101.475 148.925,102.025 U2_Bay4.4@150.525,102.025 ; U1_Bay4.4@153.225,98.725 157.25,98.725 158.325,97.65 158.325,95.925 v1(157.5,95.1) ; v1(158.4,94.725) 159.851,96.176 160.651,96.176 162.225,97.75 R6_Bay4.1@162.25,97.75 ; R4_Bay4.1@158.5,72.05 R5_Bay4.1@158.5,77.65 159.551,77.65 159.7,77.799 159.7,83.275 v1(159.25,83.725) ; R2_Bay4.1@161.25,85.1 v1(162.125,85.1) ; v1(162.35,88.475) R1_Bay4.1@162.35,89.325
+12: C17.1 C18.1 C19.1 D2.1 D3.1 R23.1 R_SHUNT1_Bay1.1 R_SHUNT1_Bay2.1 R_SHUNT1_Bay3.1 R_SHUNT1_Bay4.1 U1_Bay1.1 U1_Bay2.1 U1_Bay3.1 U1_Bay4.1 U8.1 U8.2 U8.3 U9.3 U9.5 | length 55.8
  Top Layer w0.5: U1_Bay1.1@21.975,96.775 25,96.775 v1(25.7,97.475) ; R_SHUNT1_Bay1.1@28.25,109.722 33.053,109.722 v1(33.3,109.475) ; U1_Bay2.1@66.975,96.775 70,96.775 v1(70.7,97.475) ; R_SHUNT1_Bay2.1@73.25,109.722 78.053,109.722 v1(78.3,109.475) ; U1_Bay3.1@110.725,96.775 113.75,96.775 v1(114.45,97.475) ; R_SHUNT1_Bay3.1@117,109.722 121.803,109.722 v1(122.05,109.475) ; C19.1@117.675,159.54 117.7,159.54 v1(118.625,158.615) ; v1@118.625,160.275 119.68,160.275 120.205,160.8 U9.3@120.425,160.8 ; U9.5@123.175,161.75 126.375,161.75 v1(127.35,162.725) ; v1(146.85,142.875) 148.525,142.875 149.15,143.5 149.565,143.5 149.95,143.885 D2.1@149.95,144.3 ; R23.1@148.775,159.7 150.175,159.7 v1(151.225,160.75) ; v1(149.515,149.552) 149.542,149.552 149.644,149.45 C17.1@150.825,149.45 ; v1(149.525,147.075) 149.544,147.094 150.484,147.094 150.81,147.42 150.83,147.42 150.85,147.44 C18.1@150.85,147.46 ; U1_Bay4.1@153.225,96.775 156.25,96.775 v1(156.95,97.475) ; v1(155.65,153.3) D3.1@155.65,155.35 ; R_SHUNT1_Bay4.1@159.5,109.722 163.478,109.722 v1(163.95,109.25)
  other v1: 149.5,148.225 118.625,160.29
BAT_A0_3: "U5_Bay 1_DIS.6" "U5_Bay 2_DIS.6" "U5_Bay 3_DIS.6" "U5_Bay 3_DIS.7" "U5_Bay 4_DIS.6" MD1.33 R19.2 U1_Bay1.6 U1_Bay2.6 U1_Bay3.6 U1_Bay3.7 U1_Bay4.6 U2_Bay1.6 U2_Bay2.6 U2_Bay3.6 U2_Bay3.7 U2_Bay4.6 U6.9 U7.3 | length 424.1
  Top Layer w0.2: U1_Bay1.6@19.025,98.075 17.917,98.075 17.8,98.192 17.8,99.9 18.425,100.525 20.983,100.525 21.1,100.642 21.1,102.475 21.3,102.675 U2_Bay1.6@22.225,102.675 23.508,102.675 23.65,102.817 23.65,105.875 20.25,109.275 19.463,109.275 15.856,112.881 15.856,114.025 15.856,115.081 16.35,115.575 27.836,115.575 34.175,109.236 v1(34.175,99.425) 34.175,99.05 ; U6.9@41.5,149.675 42.35,149.675 42.7,149.325 v1(42.7,147.7) ; v1(48.775,149.075) 49.375,149.675 50.375,149.675 49.45,148.75 R19.2@49.45,147.675 ; U7.3@50.975,149.675 52.558,149.675 52.675,149.558 52.675,147.217 52.792,147.1 56.825,147.1 58.9,149.175 v1(58.9,152.7) 59.475,152.125 v1(59.475,148.925) ; v1(59.45,143.825) 59.45,137.45 v1(61,135.9) ; v1(62.55,97.675) 62.95,98.075 U1_Bay2.6@64.025,98.075 ; 62.917,98.075 62.8,98.192 62.8,99.9 63.425,100.525 65.983,100.525 66.1,100.642 66.1,102.475 66.3,102.675 U2_Bay2.6@67.225,102.675 68.508,102.675 68.65,102.817 68.65,105.875 65.25,109.275 64.463,109.275 62.659,111.078 62.409,111.078 60.606,112.881 60.606,114.4 60.831,114.625 60.831,114.679 61.902,115.75 v1(63.275,115.75) 64.319,115.75 68.558,119.988 68.558,128.458 65.709,131.307 55.197,131.307 54.664,130.773 48.565,130.773 48.373,130.965 48.373,131.235 49.448,132.31 75.213,132.31 85.88,121.644 85.88,119.63 93.16,112.35 94.859,112.35 96.011,111.198 103.785,111.198 104.106,111.519 104.106,114.275 104.756,114.275 ; v1(76.1,153) 76.55,153.45 MD1.33@78.325,153.45 ; U1_Bay3.7@107.775,97.425 U1_Bay3.6@107.775,98.075 106.667,98.075 106.55,98.192 106.55,99.9 107.175,100.525 109.733,100.525 109.85,100.642 109.85,102.475 110.05,102.675 112.258,102.675 112.4,102.817 112.4,105.875 109,109.275 v1(108.213,109.275) ; v1(128.125,115.075) 132.175,115.075 135.8,111.45 144.6,111.45 v1(144.625,111.475) ; v1(145.725,113.15) 146.058,113.483 146.058,113.499 146.381,113.822 146.381,114.4 146.506,114.525 146.506,113.381 148.559,111.328 148.659,111.328 150.713,109.275 151.5,109.275 154.9,105.875 154.9,102.817 154.758,102.675 U2_Bay4.6@153.475,102.675 152.55,102.675 152.023,102.148 152.023,100.642 151.906,100.525 149.675,100.525 149.05,99.9 149.05,98.192 149.167,98.075 U1_Bay4.6@150.275,98.075
  Top Layer w0.254: v1(104.75,112.95) 104.756,112.956 104.756,114.275 ; v1(108.213,109.275) 111.975,105.513 111.975,103.474 111.826,103.325 U2_Bay3.7@110.975,103.325
  Bottom Layer w0.2: v1(34.175,99.425) 46.48,99.425 48.469,101.414 60.759,101.414 62.55,99.623 v1(62.55,97.675) ; v1(42.7,147.7) 47.4,147.7 v1(48.775,149.075) ; v1(58.9,152.7) 58.904,152.7 60.006,153.802 75.298,153.802 v1(76.1,153) ; v1(59.45,143.825) 59.45,143.84 59.475,143.865 v1(59.475,148.925) ; v1(61,135.9) 63.275,133.625 v1(63.275,115.75) ; v1(108.213,109.275) 104.76,112.727 104.76,112.94 v1(104.75,112.95) 105.077,113.277 111.562,113.277 112.166,112.673 125.723,112.673 v1(128.125,115.075) ; v1(144.625,111.475) 145.175,112.025 145.175,112.6 v1(145.725,113.15)
BAT_A0_4: "U5_Bay 1_DIS.5" "U5_Bay 2_DIS.5" "U5_Bay 3_DIS.5" "U5_Bay 4_DIS.5" "U5_Bay 4_DIS.7" MD1.36 R18.2 U1_Bay1.5 U1_Bay1.8 U1_Bay2.5 U1_Bay2.8 U1_Bay3.5 U1_Bay3.8 U1_Bay4.5 U1_Bay4.7 U1_Bay4.8 U2_Bay1.5 U2_Bay2.5 U2_Bay3.5 U2_Bay4.5 U2_Bay4.7 U6.10 U7.2 | length 406
  Top Layer w0.254: 15.206,114.025 15.206,112.994 v1(20.55,107.65) ; U1_Bay1.8@19.025,96.775 20.251,96.775 20.4,96.924 20.4,98.425 20.1,98.725 U1_Bay1.5@19.025,98.725 19.075,98.775 19.075,99.976 19.224,100.125 21.525,100.125 22.225,100.825 U2_Bay1.5@22.225,102.025 23.925,102.025 v1(24.025,102.125) ; v1(41.5,147.725) U6.10@41.5,149.175 ; v1(45.975,143.4) 46.225,143.15 v1(46.225,135.75) ; R18.2@47.85,152.05 v1(48.725,152.05) 49.304,152.629 49.304,155.379 v1(49.775,155.85) ; v1(49.425,150.375) 49.627,150.173 50.973,150.173 U7.2@50.975,150.175 ; v1(59.975,115.275) 59.975,114.044 59.956,114.025 59.956,108.019 60.325,107.65 v1(65.55,107.65) ; U1_Bay2.8@64.025,96.775 65.251,96.775 65.4,96.924 65.4,98.425 65.1,98.725 U1_Bay2.5@64.025,98.725 64.075,98.775 64.075,99.976 64.224,100.125 66.525,100.125 67.225,100.825 U2_Bay2.5@67.225,102.025 68.925,102.025 v1(69.025,102.125) ; v1(74.275,157.275) 74.29,157.26 MD1.36@78.325,157.26 ; 103.456,114.275 103.456,111.719 v1(103.65,111.525) ; U1_Bay3.8@107.775,96.775 109.001,96.775 109.15,96.924 109.15,98.425 108.85,98.725 U1_Bay3.5@107.775,98.725 107.825,98.775 107.825,99.976 107.974,100.125 110.275,100.125 110.975,100.825 U2_Bay3.5@110.975,102.025 112.675,102.025 v1(112.775,102.125) 115.25,99.65 v1(117.4,99.65) ; v1(121.3,101.25) 122.525,102.475 v1(122.525,106.875) ; 145.856,114.525 145.856,114.9 146.054,115.098 146.054,115.19 146.216,115.352 146.796,115.352 147.058,115.09 147.058,114.623 147.156,114.525 147.156,113.269 v1(148.05,112.375) ; v1(149.7,109.2) 149.3,109.2 v1(146.775,111.725) 146.775,111.125 150.25,107.65 v1(151.8,107.65) ; U1_Bay4.7@150.275,97.425 U1_Bay4.8@150.275,96.775 151.501,96.775 151.65,96.924 151.65,98.425 151.35,98.725 U1_Bay4.5@150.275,98.725 150.325,98.775 150.325,99.976 150.474,100.125 152.775,100.125 153.475,100.825 U2_Bay4.5@153.475,102.025 ; v1(152.35,102) 152.375,102.025 U2_Bay4.5@153.475,102.025 ; v1(152.35,103.3) 152.375,103.325 U2_Bay4.7@153.475,103.325 ; v1(155.275,102.125) 155.175,102.025 U2_Bay4.5@153.475,102.025
  Bottom Layer w0.254: v1(24.025,102.125) 24.025,106.1 22.475,107.65 v1(20.55,107.65) 31.225,118.325 31.225,131.225 34.6,134.6 46.076,134.6 46.225,134.749 ; v1(41.5,147.725) 42.125,147.1 45.975,147.1 ; v1(45.975,143.4) 45.975,147.1 ; v1(46.225,135.75) 46.225,134.749 ; v1(48.725,152.05) 49.425,151.35 v1(49.425,150.375) 49.129,150.079 49.129,148.928 47.574,147.373 46.798,147.373 46.525,147.1 45.975,147.1 ; v1(49.775,155.85) 58.325,155.85 59.75,157.275 v1(74.275,157.275) ; v1(59.975,115.275) 59.975,118.01 54.639,123.346 52.953,123.346 46.225,130.074 46.225,134.749 ; v1(65.55,107.65) 67.475,107.65 69.025,106.1 v1(69.025,102.125) 70.275,102.125 70.802,102.652 72.052,102.652 77.427,97.277 77.427,73.247 78.478,72.196 78.772,72.196 79.321,72.745 79.321,98.722 92.268,111.669 97.118,111.669 97.977,112.527 102.827,112.527 103.65,111.704 v1(103.65,111.525) 107.525,107.65 111.225,107.65 112.775,106.1 v1(112.775,102.125) ; v1(117.4,99.65) 119.7,99.65 v1(121.3,101.25) ; v1(122.525,106.875) 133.957,106.875 136.284,109.202 149.698,109.202 v1(149.7,109.2) ; v1(146.775,111.725) 147.4,111.725 v1(148.05,112.375) ; v1(151.8,107.65) 153.725,107.65 155.275,106.1 v1(155.275,102.125) ; v1(152.35,102) v1(152.35,103.3)
BUCK_SW_PIN: C14.2 L2.1 U9.2 | length 8.1
  Top Layer w0.5: C14.2@117.55,162.225 118.57,162.225 119.001,161.794 119.001,161.076 v1(119,161.075) ; v1(118.925,159.4) 119.3,159.025 119.3,158.918 120.882,158.918 L2.1@121.05,158.75 ; 119.001,161.779 120.396,161.779 U9.2@120.425,161.75
  Bottom Layer w0.5: v1(118.925,159.4) 119.129,159.604 119.129,160.946 v1(119,161.075)
CELL_POS1: "Q2_Bay 1_DIS.2" C3_Bay1.1 C4_Bay1.1 J3_Bay_holder1.2 RS1_Bay1.2 U2_Bay1.2 U3_Bay1.9 | length 58.5
  Top Layer w0.4: 11.931,117 14.4,114.531 v1(14.4,111.85) ; J3_Bay_holder1.2@15.5,79.36 15.5,81.425 v1(16.85,82.775) ; v1(16.85,90.675) 16.85,93.575 16.6,93.825 14.234,93.825 14,94.059 RS1_Bay1.2@14,95.778 16.391,95.778 16.625,96.013 v1(16.625,103.325) U2_Bay1.2@19.275,103.325 ; C3_Bay1.1@20.66,85.5 21.025,85.865 U3_Bay1.9@21.025,86.89 ; C4_Bay1.1@20.75,84.5 20.75,84.525 20.64,84.635 C3_Bay1.1@20.64,85.5 20.675,85.465 21.13,85.465 21.625,84.97 v1(21.625,84.625)
  Bottom Layer w0.4: v1(14.4,111.85) 14.4,105.55 v1(16.625,103.325) ; v1(16.85,90.675) v1(16.85,82.775) 21.391,82.775 21.625,83.009 v1(21.625,84.625)
CELL_POS2: "Q2_Bay 2_DIS.2" C3_Bay2.1 C4_Bay2.1 J3_Bay_holder2.2 RS1_Bay2.2 U2_Bay2.2 U3_Bay2.9 | length 62.1
  Top Layer w0.4: 56.681,117 59.15,114.531 v1(59.15,111.85) ; J3_Bay_holder2.2@57,79.36 60.5,79.36 60.5,81.425 v1(61.85,82.775) ; v1(61.85,90.675) 61.85,93.575 61.6,93.825 59.234,93.825 59,94.059 RS1_Bay2.2@59,95.778 61.391,95.778 61.625,96.013 v1(61.625,103.325) U2_Bay2.2@64.275,103.325 ; C3_Bay2.1@65.66,85.5 66.025,85.865 U3_Bay2.9@66.025,86.89 ; C4_Bay2.1@65.75,84.5 65.75,84.525 65.64,84.635 C3_Bay2.1@65.64,85.5 65.675,85.465 66.13,85.465 66.625,84.97 v1(66.625,84.625)
  Bottom Layer w0.4: v1(59.15,111.85) 59.4,111.6 59.4,105.55 v1(61.625,103.325) ; v1(61.85,90.675) v1(61.85,82.775) 66.391,82.775 66.625,83.009 v1(66.625,84.625)
CELL_POS3: "Q2_Bay 3_DIS.2" C3_Bay3.1 C4_Bay3.1 J3_Bay_holder3.2 RS1_Bay3.2 U2_Bay3.2 U3_Bay3.9 | length 62.2
  Top Layer w0.4: 100.181,117.25 102.65,114.781 v1(102.65,112.1) ; J3_Bay_holder3.2@101,79.25 101.11,79.36 104.25,79.36 104.25,81.425 v1(105.6,82.775) ; v1(105.6,90.675) 105.6,93.575 105.35,93.825 102.984,93.825 102.75,94.059 RS1_Bay3.2@102.75,95.778 105.141,95.778 105.375,96.013 v1(105.375,103.325) U2_Bay3.2@108.025,103.325 ; C3_Bay3.1@109.41,85.5 109.775,85.865 U3_Bay3.9@109.775,86.89 ; C4_Bay3.1@109.5,84.5 109.5,84.525 109.39,84.635 C3_Bay3.1@109.39,85.5 109.425,85.465 109.88,85.465 110.375,84.97 v1(110.375,84.625)
  Bottom Layer w0.4: v1(102.65,112.1) 103.15,111.6 103.15,105.55 v1(105.375,103.325) ; v1(105.6,90.675) v1(105.6,82.775) 110.141,82.775 110.375,83.009 v1(110.375,84.625)
CELL_POS4: "Q2_Bay 4_DIS.2" C3_Bay4.1 C4_Bay4.1 J3_Bay_holder4.2 RS1_Bay4.2 U2_Bay4.2 U3_Bay4.9 | length 62.1
  Top Layer w0.4: 142.581,117.5 145.05,115.031 145.05,112.35 145.675,111.725 v1(145.675,108.775) ; J3_Bay_holder4.2@144,79.11 144.25,79.36 146.75,79.36 146.75,81.425 v1(148.1,82.775) ; v1(148.1,90.675) 148.1,93.575 147.85,93.825 145.484,93.825 145.25,94.059 RS1_Bay4.2@145.25,95.778 147.641,95.778 147.875,96.013 v1(147.875,103.325) U2_Bay4.2@150.525,103.325 ; C3_Bay4.1@151.91,85.5 152.275,85.865 U3_Bay4.9@152.275,86.89 ; C4_Bay4.1@152,84.5 152,84.525 151.89,84.635 C3_Bay4.1@151.89,85.5 151.925,85.465 152.38,85.465 152.875,84.97 v1(152.875,84.625)
  Bottom Layer w0.4: v1(145.675,108.775) 145.65,108.75 145.65,105.55 v1(147.875,103.325) ; v1(148.1,90.675) v1(148.1,82.775) 152.641,82.775 152.875,83.009 v1(152.875,84.625)
CS_MODE_Bay1: Q1_Bay1.3 U3_Bay1.13 | length 19
  Top Layer w0.2: Q1_Bay1.3@13.9,85 13.9,87.16 13.925,87.185 13.925,87.2 14.177,87.452 16.235,87.452 17.013,86.675 17.013,85.587 v1(17.8,84.8) ; U3_Bay1.13@23.86,87.775 24.783,87.775 24.95,87.608 v1(24.95,87.05)
  Bottom Layer w0.2: v1(17.8,84.8) 18.863,84.8 19.163,85.1 25.008,85.1 25.125,85.217 25.125,86.039 24.95,86.214 v1(24.95,87.05)
CS_MODE_Bay2: Q1_Bay2.3 U3_Bay2.13 | length 19
  Top Layer w0.2: Q1_Bay2.3@58.9,85 58.9,87.16 58.925,87.185 58.925,87.2 59.177,87.452 61.235,87.452 62.013,86.675 62.013,85.587 v1(62.8,84.8) ; U3_Bay2.13@68.86,87.775 69.783,87.775 69.95,87.608 v1(69.95,87.05)
  Bottom Layer w0.2: v1(62.8,84.8) 63.863,84.8 64.163,85.1 70.008,85.1 70.125,85.217 70.125,86.039 69.95,86.214 v1(69.95,87.05)
CS_MODE_Bay3: Q1_Bay3.3 U3_Bay3.13 | length 19
  Top Layer w0.2: Q1_Bay3.3@102.65,85 102.65,87.16 102.675,87.185 102.675,87.2 102.927,87.452 104.985,87.452 105.763,86.675 105.763,85.587 v1(106.55,84.8) ; U3_Bay3.13@112.61,87.775 113.533,87.775 113.7,87.608 v1(113.7,87.05)
  Bottom Layer w0.2: v1(106.55,84.8) 107.613,84.8 107.913,85.1 113.758,85.1 113.875,85.217 113.875,86.039 113.7,86.214 v1(113.7,87.05)
CS_MODE_Bay4: Q1_Bay4.3 U3_Bay4.13 | length 19
  Top Layer w0.2: Q1_Bay4.3@145.15,85 145.15,87.16 145.175,87.185 145.175,87.2 145.427,87.452 147.485,87.452 148.263,86.675 148.263,85.587 v1(149.05,84.8) ; U3_Bay4.13@155.11,87.775 156.033,87.775 156.2,87.608 v1(156.2,87.05)
  Bottom Layer w0.2: v1(149.05,84.8) 150.113,84.8 150.413,85.1 156.258,85.1 156.375,85.217 156.375,86.039 156.2,86.214 v1(156.2,87.05)
D+: J4.A6 J4.B6 U10.2 U10.5 U11.4 | length 26.8
  Top Layer w0.269: U11.4@21.05,159.675 21.166,159.791 22.755,159.791 23.15,160.186 23.15,164.268 23.307,164.425 26.404,164.425 27.984,162.845 27.991,162.845 28.311,162.525 28.311,162.07 28.147,161.906 28.147,160.95 27.945,160.748 J4.B6@27.945,160.645 ; J4.A6@28.595,159.395 28.595,158.945 28.543,158.893 28.543,156.371 31.618,153.296 31.618,151.586 31.133,151.101 30.582,151.101 30.193,151.49 30.193,151.795 29.95,152.038 U10.5@29.95,152.9
D-: J4.A7 J4.B7 U10.3 U10.4 U11.5 | length 26.5
  Top Layer w0.269: U11.5@20.725,160.175 20.991,160.175 21.002,160.186 22.591,160.186 22.754,160.35 22.754,164.431 23.144,164.821 26.568,164.821 28.148,163.241 28.155,163.241 28.707,162.689 28.707,161.906 28.543,161.742 28.543,160.95 28.745,160.748 J4.B7@28.745,160.645 ; J4.A7@28.095,159.395 28.095,158.945 28.147,158.893 28.147,156.207 31.222,153.132 31.222,151.75 30.969,151.497 30.746,151.497 30.589,151.654 30.589,152.644 30.35,152.883 U10.4@30.35,152.9
DIS_DAC_RDY: R21.2 U7.5 | length 10.3
  Top Layer w0.2: U7.5@50.975,148.675 50.975,147.54 51.125,147.39 v1(51.125,147.375) ; v1(52.325,153.175) 52.325,154 52.525,154.2 53.55,154.2 R21.2@53.575,154.175
  Bottom Layer w0.2: v1(51.125,147.375) 51.983,147.375 52.325,147.717 v1(52.325,153.175)
DTR: Q4.2 R28.1 U11.28 | length 16.7
  Top Layer w0.254: v1(17.275,151.375) 17.275,148.05 R28.1@17.325,148 ; R28.1@17.35,148 18.95,146.4 18.95,144.699 19.099,144.55 21.265,144.55 Q4.2@21.29,144.525 ; v1(19.825,155.875) U11.28@19.825,157.275
  Bottom Layer w0.254: v1(17.275,151.375) 17.3,151.4 17.3,152.275 19.825,154.8 v1(19.825,155.875)
ESP32_EN_UART: C10.1 MD1.3 Q3.3 R10.2 SW2.1 SW2.2 | length 105
  Top Layer w0.254: Q3.3@23.385,141.525 28.3,141.525 v1(28.4,141.625) ; v1(51.375,156.65) 53.525,156.65 55.05,158.175 R10.2@55.075,158.175 55.125,158.125 56.1,158.125 56.26,158.285 C10.1@57.075,158.285 57.075,157.625 57.44,157.26 MD1.3@60.825,157.26 68.7,157.26 71.917,160.477 80.149,160.477 82.6,158.026 v1(82.6,157.725) ; v1(99.456,157.77) 99.476,157.75 SW2.1@103.8,157.75 SW2.2@113.8,157.75
  Bottom Layer w0.254: v1(28.4,141.625) 32.075,141.625 37.075,146.625 37.075,153.576 37.224,153.725 39.025,153.725 41.95,156.65 v1(51.375,156.65) ; v1(82.6,157.725) 82.645,157.77 v1(99.456,157.77)
"gate_vout_Bay 1_DIS": "Q2_Bay 1_DIS.1" "R14_Bay 1_DIS.1" "R16_Bay 1_DIS.2" | length 8
  Top Layer w0.2: 4.431,113.35 6.431,113.35 6.456,113.325 8.475,113.325 9.61,114.46 11.931,114.46
"gate_vout_Bay 2_DIS": "Q2_Bay 2_DIS.1" "R14_Bay 2_DIS.1" "R16_Bay 2_DIS.2" | length 8
  Top Layer w0.2: 49.181,113.35 51.181,113.35 51.206,113.325 53.225,113.325 54.36,114.46 56.681,114.46
"gate_vout_Bay 3_DIS": "Q2_Bay 3_DIS.1" "R14_Bay 3_DIS.1" "R16_Bay 3_DIS.2" | length 8
  Top Layer w0.2: 92.681,113.6 94.681,113.6 94.706,113.575 96.725,113.575 97.86,114.71 100.181,114.71
"gate_vout_Bay 4_DIS": "Q2_Bay 4_DIS.1" "R14_Bay 4_DIS.1" "R16_Bay 4_DIS.2" | length 8
  Top Layer w0.2: 135.081,113.85 137.081,113.85 137.106,113.825 139.125,113.825 140.26,114.96 142.581,114.96
GND: "R13_Bay 1_DIS.2" "R13_Bay 2_DIS.2" "R13_Bay 3_DIS.2" "R13_Bay 4_DIS.2" "R14_Bay 1_DIS.2" "R14_Bay 2_DIS.2" "R14_Bay 3_DIS.2" "R14_Bay 4_DIS.2" "R17_Bay 1_DIS.2" "R17_Bay 2_DIS.2" "R17_Bay 3_DIS.2" "R17_Bay 4_DIS.2" "U4_Bay 1_DIS.2" "U4_Bay 2_DIS.2" "U4_Bay 3_DIS.2" "U4_Bay 4_DIS.2" "U5_Bay 1_DIS.2" "U5_Bay 1_DIS.3" "U5_Bay 1_DIS.7" "U5_Bay 1_DIS.8" "U5_Bay 2_DIS.2" "U5_Bay 2_DIS.3" "U5_Bay 2_DIS.8" "U5_Bay 3_DIS.2" "U5_Bay 3_DIS.3" "U5_Bay 3_DIS.8" "U5_Bay 4_DIS.2" "U5_Bay 4_DIS.3" "U5_Bay 4_DIS.8" C1_Bay1.2 C1_Bay2.2 C1_Bay3.2 C1_Bay4.2 C2_Bay1.2 C2_Bay2.2 C2_Bay3.2 C2_Bay4.2 C3_Bay1.2 C3_Bay2.2 C3_Bay3.2 C3_Bay4.2 C4_Bay1.2 C4_Bay2.2 C4_Bay3.2 C4_Bay4.2 C5_Bay1.2 C5_Bay2.2 C5_Bay3.2 C5_Bay4.2 C6_Bay1.2 C6_Bay2.2 C6_Bay3.2 C6_Bay4.2 C7_Bay1.2 C7_Bay2.2 C7_Bay3.2 C7_Bay4.2 C8.2 C9.2 C10.2 C11.2 C12.2 C13.2 C15.2 C16.2 C17.2 C18.2 C19.2 C20.2 C21.2 D1_Bay1.2 D1_Bay2.2 D1_Bay3.2 D1_Bay4.2 D2.2 DS3.2 J1.2 J2.9 J2.M1 J2.M2 J3_Bay_holder1.1 J3_Bay_holder2.1 J3_Bay_holder3.1 J3_Bay_holder4.1 J4.A1 J4.A12 J4.B1 J4.B12 J4.Shell MD1.1 MD1.15 MD1.38 MD1.39 Q1_Bay1.2 Q1_Bay2.2 Q1_Bay3.2 Q1_Bay4.2 R3_Bay1.2 R3_Bay2.2 R3_Bay3.2 R3_Bay4.2 R7_Bay1.1 R7_Bay2.1 R7_Bay3.1 R7_Bay4.1 R9_Bay1.2 R9_Bay2.2 R9_Bay3.2 R9_Bay4.2 R24.2 R25.2 R32.1 R33.1 R34.2 R36.2 SW1.3 SW1.4 SW2.3 SW2.4 U1_Bay1.3 U1_Bay1.7 U1_Bay2.3 U1_Bay3.3 U1_Bay4.3 U2_Bay1.3 U2_Bay1.7 U2_Bay2.3 U2_Bay3.3 U2_Bay4.3 U3_Bay1.7 U3_Bay1.12 U3_Bay1.17 U3_Bay2.7 U3_Bay2.12 U3_Bay2.17 U3_Bay3.7 U3_Bay3.12 U3_Bay3.17 U3_Bay4.7 U3_Bay4.12 U3_Bay4.17 U6.1 U6.3 U7.4 U7.10 U9.1 U10.1 U11.3 U11.29 | length 211.2